# Altium PCB Driver_10kW.PcbDoc (part 2 of 2)
Units mm, origin at the board's own origin, x right, y up, seen from the top; angles counter-clockwise.
Board outline 425.08 x 200.2 mm, 2 copper layers (Top Layer, Bottom Layer); 139 components, 65 nets, 350 pads, 391 vias.
Unrouted connection lines stored in the file: 4.
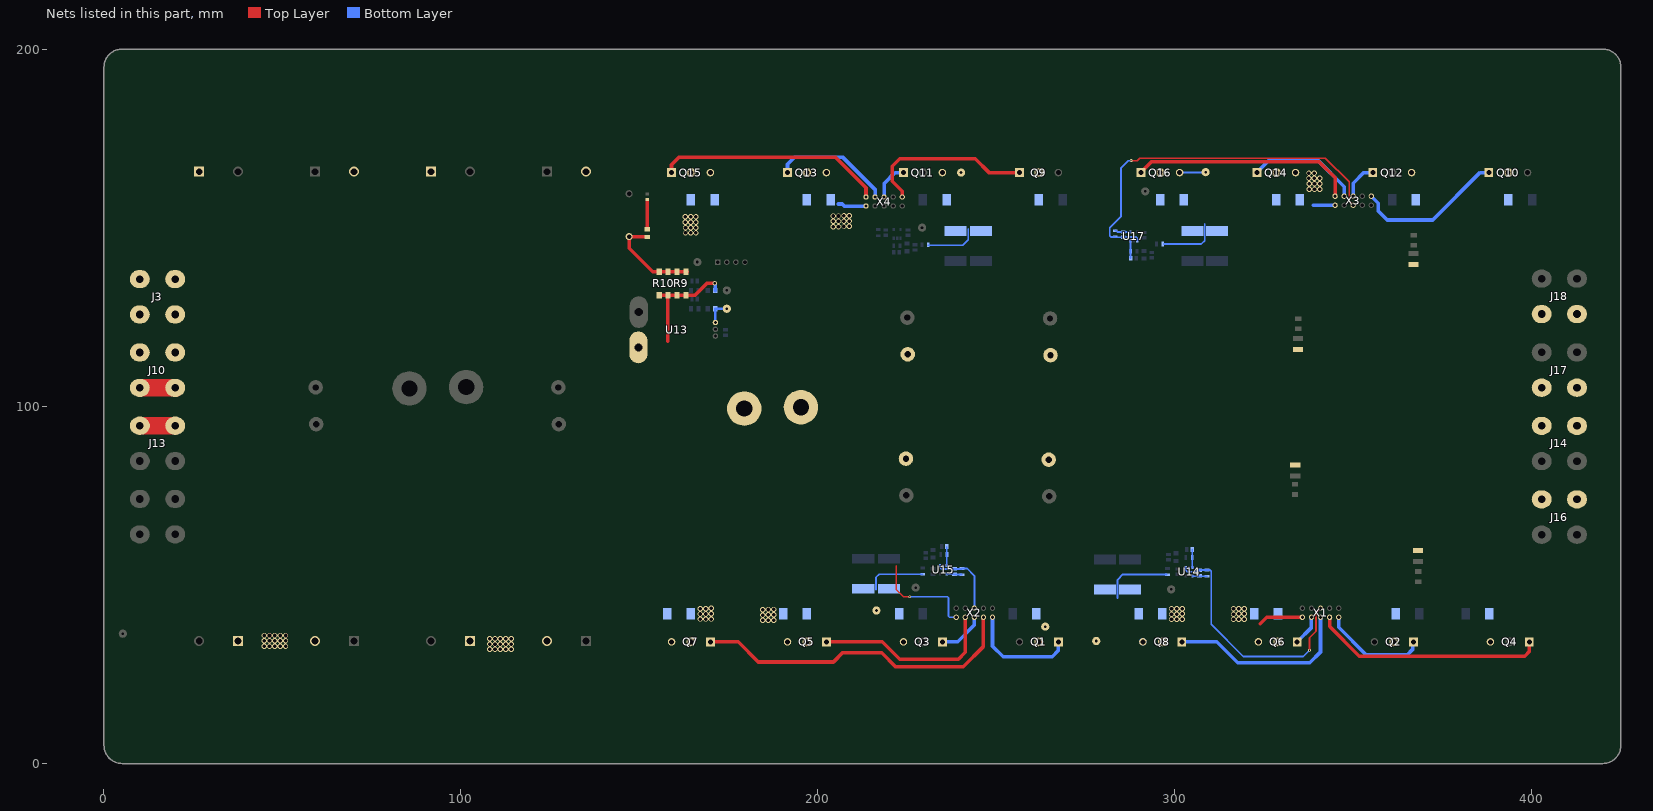
[diagram p2: the nets of this part, all layers, seen from the top]

## Via types
v1: diameter 1.5, hole 1, Top Layer to Bottom Layer, 357 vias
v2: diameter 8, hole 4.5, Top Layer to Bottom Layer, 18 vias
v3: diameter 5, hole 3, Top Layer to Bottom Layer, 8 vias
v4: diameter 0.8, hole 0.3, Top Layer to Bottom Layer, 7 vias
v5: diameter 1.27, hole 0.711, Top Layer to Bottom Layer, 1 vias

## Nets (pads, with @x,y where several pads share a name; then routed paths per layer and width w, separated by ;. In a path a pad name is that pad's centre, name@x,y a point inside that pad or via, vN(x,y) a via of type N, cw(c..) or ccw(c..) an arc to the next point about the centre after c; other vN are vias at no path point) (continued)
NetC49_1: C49.1 R71.1 U17.3 | length 4.9
  Bottom Layer w0.5: C49.1@287.661,141.626 U17.3@287.661,146.525
NetC50_1: C50.1 R72.2 U17.4 | length 4.4
  Bottom Layer w0.5: R72.2@283.414,149.351 283.69,149.351 284.066,148.975 C50.1@285.627,148.975 285.652,148.95 287.636,148.95 U17.4@287.661,148.925
NetC50_2: C50.2 R72.1 U17.1 X3.8 | length 103.6
  Top Layer w0.4: v4(287.863,168.951) 289.596,168.951 290.295,169.65 342.225,169.65 348.9,162.975 348.9,157.64 X3.8@350.08,156.46
  Bottom Layer w0.5: R72.1@283.414,147.599 282.169,147.599 281.876,147.892 281.876,150.176 285.025,153.325 285.025,166.95 287.026,168.951 v4(287.863,168.951) ; R72.1@283.54,147.475 C50.2@285.627,147.475 ; C50.2@285.627,147.551 289.193,147.551 289.486,147.258 289.486,146.6 U17.1@289.561,146.525
NetC51_1: C51.1 R73.1 U14.3 | length 5.1
  Bottom Layer w0.5: C51.1@304.945,60 R73.1@304.945,57.769 304.945,55.172 305.023,55.094 U14.3@305.023,54.969
NetC52_1: C52.1 R76.2 U14.4 | length 4.1
  Bottom Layer w0.5: U14.4@305.023,52.569 305.098,52.493 R76.2@309.094,52.493
NetC52_2: C52.2 R76.1 U14.1 X1.8 | length 68.4
  Top Layer w0.5: v4(337.825,31.77) 337.825,35.246 339.65,37.071 339.65,42.27 X1.8@340.92,43.54
  Bottom Layer w0.5: U14.1@303.123,54.969 303.123,54.219 303.573,53.769 305.958,53.769 306.434,54.245 307.044,54.245 R76.1@309.094,54.245 310.007,54.245 310.3,53.952 310.3,39 319.3,30 336.055,30 v4(337.825,31.77)
NetC53_1: C53.1 R74.1 U15.3 | length 5.2
  Bottom Layer w0.5: C53.1@236.177,60.667 236.177,55.513 U15.3@236.19,55.5
NetC54_1: C54.1 R77.2 U15.4 | length 4.3
  Bottom Layer w0.5: U15.4@236.19,53.1 236.215,53.075 238.335,53.075 C54.1@238.36,53.05 238.423,52.987 240.397,52.987 R77.2@240.46,52.924
NetC54_2: C54.2 R77.1 U15.1 X2.8 | length 20.4
  Bottom Layer w0.5: U15.1@234.29,55.5 234.365,55.425 234.365,54.843 234.658,54.55 C54.2@238.36,54.55 240.334,54.55 R77.1@240.46,54.676 241.874,54.676 243.92,52.63 X2.8@243.92,43.54
NetD1_1: D1.1 D2.3 J3.1
NetD3_1: D3.1 D4.3 J3.2
NetD5_1: D5.1 D6.3 J10.1
  other v1: 108.1,32 109.6,32 111.1,32 112.6,32 114.1,32 108.1,33.5 109.6,33.5 111.1,33.5 112.6,33.5 114.1,33.5 108.1,35 109.6,35 111.1,35 112.6,35 114.1,35
NetD7_3: D7.3 D8.1 J10.2 J13.1 | length 19.9
  Top Layer w5: J10.2@10.06,105.3 J10.2@19.966,105.3 J10.2@19.974,105.293 ; J13.1@10.075,94.675 J13.1@19.981,94.675 J13.1@19.974,94.683
  Bottom Layer w5: J13.1@19.981,94.675 J13.1@19.996,94.66
  other v1: 44.9,32.9 46.4,32.9 47.9,32.9 49.4,32.9 50.9,32.9 44.9,34.4 46.4,34.4 47.9,34.4 49.4,34.4 50.9,34.4 44.9,35.9 46.4,35.9 47.9,35.9 49.4,35.9 50.9,35.9
NetJ14_2: J14.2 Q5.3 Q7.2 R23.1 VD5.2 VD7.1 X2.5 | length 29.7
  Top Layer w0.5: 222.021,55.385 222.021,48.779 224.05,46.75 v4(225.825,46.75)
  Bottom Layer w0.5: v4(225.825,46.75) 236.376,46.75 236.669,46.457 236.669,41.293 236.962,41 X2.5@238.84,41
  other v1: 184.65,40.125 186.175,40.175 187.675,40.2 167.15,40.5 168.65,40.5 170.175,40.5 184.65,41.625 186.175,41.675 187.675,41.7 167.15,41.925 168.65,41.925 170.175,42 184.65,43.125 186.175,43.175 187.675,43.2 167.15,43.425 168.65,43.425 170.175,43.475 170.175,43.5
NetJ16_2: J16.2 Q6.3 Q8.2 R24.1 VD6.2 VD8.1 X1.5 | length 12.6
  Top Layer w1: 324.025,39.15 325.875,41 X1.5@335.84,41
  other v1: 299.15,40.45 300.65,40.45 302.175,40.45 316.525,40.45 318.05,40.45 319.55,40.45 299.15,41.875 300.65,41.875 316.525,41.875 302.175,41.95 318.05,41.95 319.55,41.95 299.15,43.375 300.65,43.375 316.525,43.375 302.175,43.425 318.05,43.425 319.55,43.425 302.175,43.45 318.05,43.45 319.55,43.45
NetJ17_1: J17.1 Q13.3 Q15.2 R64.1 VD13.2 VD15.1 X4.6 | length 7.9
  Bottom Layer w1: 205.85,156.8 206.875,156.8 207.44,156.235 X4.6@213.555,156.235
  other v1: 162.975,148.7 164.475,148.7 165.9,148.7 162.975,150.2 164.475,150.2 165.9,150.2 204.35,150.45 205.85,150.45 207.375,150.5 208.875,150.525 162.9,151.725 162.925,151.725 164.4,151.725 165.9,151.725 204.35,151.95 205.85,151.95 207.375,152 208.875,152.025 162.9,153.225 162.925,153.225 164.4,153.225 165.9,153.225 204.35,153.45 205.85,153.45 207.375,153.5 208.875,153.525
NetJ18_1: J18.1 Q14.3 Q16.2 R65.1 VD14.2 VD16.1 X3.6 | length 6.2
  Bottom Layer w0.5: 338.8,156.35 338.91,156.46
  Bottom Layer w1: 338.91,156.46 X3.6@345,156.46
  other v1: 337.725,160.95 339.225,160.95 340.725,160.95 337.725,162.45 339.225,162.45 340.725,162.45 337.675,163.975 339.175,163.975 340.675,163.975 337.675,165.475 339.175,165.475
NetQ1_1: Q1.1 X2.1 | length 30.9
  Bottom Layer w1: X2.1@249,41 249,32.925 251.975,29.95 265.7,29.95 267.44,31.69 Q1.1@267.44,34.125
NetQ2_1: Q2.1 X1.1 | length 29.5
  Bottom Layer w1: X1.1@346,41 346,38.2 353.675,30.525 365.275,30.525 366.711,31.961 366.711,33.921 Q2.1@366.915,34.125
NetQ3_1: Q3.1 X2.3 | length 13.1
  Bottom Layer w1: Q3.1@234.94,34.125 239.225,34.125 243.92,38.82 X2.3@243.92,41
NetQ3_3: Q3.3 Q7.3 R1.2 R40.2 R42.2 TP34.1 VD3.2 VD7.2 | length 16.9
  Bottom Layer w0.5: 216.35,48.766 216.35,52.175 217.256,53.081 R1.2@229.436,53.081
NetQ4_1: Q4.1 X1.2 | length 65.2
  Top Layer w1: X1.2@343.46,41 343.46,38.44 351.775,30.125 398.125,30.125 399.415,31.415 Q4.1@399.415,34.125
NetQ4_3: Q4.3 Q8.3 R2.2 R45.2 R46.2 TP35.1 VD4.2 VD8.2 | length 19.7
  Bottom Layer w0.5: 283.975,46.35 284.05,46.425 284.05,51.53 285.545,53.025 R2.2@297.775,53.025
  Bottom Layer w2: Q8.3@291.1,34.212 291.16,34.152 Q8.3@291.16,34.125
NetQ5_1: Q5.1 X2.4 | length 51.6
  Top Layer w1: Q5.1@202.44,34.125 218.125,34.125 223.025,29.225 239.45,29.225 241.38,31.155 X2.4@241.38,41
NetQ6_1: Q6.1 X1.4 | length 8.5
  Bottom Layer w1: Q6.1@334.39,34.125 338.38,38.115 X1.4@338.38,41
NetQ7_1: Q7.1 X2.2 | length 92
  Top Layer w1: Q7.1@169.94,34.125 177.725,34.125 183.375,28.475 204.425,28.475 206.975,31.025 217.95,31.025 221.825,27.15 240.775,27.15 246.46,32.835 X2.2@246.46,41
NetQ8_1: Q8.1 X1.3 | length 52.3
  Bottom Layer w1: Q8.1@302.04,34.125 311.825,34.125 317.725,28.225 337.875,28.225 340.92,31.27 X1.3@340.92,41
NetQ9_1: Q9.1 X4.5 | length 47.9
  Top Layer w1: X4.5@223.715,158.775 223.715,160.351 220.875,163.191 220.875,167.349 223.015,169.488 244.137,169.488 248,165.625 Q9.1@256.56,165.625
NetQ10_1: Q10.1 X3.5 | length 42.5
  Bottom Layer w1: X3.5@355.16,159 357.1,157.06 357.1,154.825 359.6,152.325 372.325,152.325 385.625,165.625 Q10.1@388.06,165.625
NetQ11_1: Q11.1 X4.3 | length 10.5
  Bottom Layer w1: X4.3@218.635,158.775 218.635,162.56 221.7,165.625 Q11.1@224.06,165.625
NetQ11_3: Q11.3 Q15.3 R5.2 R107.2 R109.2 TP56.1 VD11.2 VD15.2 | length 15
  Bottom Layer w0.5: R5.2@230.894,145.275 240.65,145.275 242.2,146.825 242.2,149.902
NetQ12_1: Q12.1 X3.3 | length 10.4
  Bottom Layer w1: X3.3@350.08,159 350.08,162.63 353.075,165.625 Q12.1@355.56,165.625
NetQ12_3: Q12.3 Q16.3 R6.2 R112.2 R114.2 TP57.1 VD12.2 VD16.2 | length 24
  Top Layer w0.5: Q16.3@301.44,165.625 Q16.3@301.49,165.675 ; TP57.1@308.675,165.675 TP57.1@308.725,165.725
  Bottom Layer w0.5: R6.2@297.066,145.6 307.525,145.6 308.45,146.525 308.45,151.25 ; Q16.3@301.44,165.625 301.49,165.675 308.675,165.675 TP57.1@308.725,165.725
NetQ13_1: Q13.1 X4.2 | length 33.5
  Bottom Layer w1: Q13.1@191.56,165.625 191.56,167.992 193.418,169.85 207.125,169.85 216.095,160.88 X4.2@216.095,158.775
NetQ14_1: Q14.1 X3.2 | length 31.7
  Bottom Layer w1: Q14.1@323.06,165.625 326.56,169.125 340.05,169.125 347.54,161.635 X3.2@347.54,159
NetQ15_1: Q15.1 X4.1 | length 63.6
  Top Layer w1: Q15.1@159.06,165.625 159.06,167.81 161.1,169.85 205.075,169.85 213.555,161.37 X4.1@213.555,158.775
NetQ16_1: Q16.1 X3.1 | length 62.7
  Top Layer w1: Q16.1@290.56,165.625 293.53,168.595 340.58,168.595 345,164.175 X3.1@345,159
NetR9_1: R9.1 R10.1 R121.2 VD17.1 | length 27.4
  Top Layer w1: R121.2@152.3,147.599 152.262,147.637 147.213,147.637 VD17.1@147.175,147.675 147.175,144.411 153.761,137.825 R10.1@155.6,137.825 R10.1@158.05,137.825 161,137.825 R9.1@163.45,137.825
NetR54_2: R54.2 TP3.1 U13.3 | length 7.2
  Bottom Layer w0.5: R54.2@171.276,127.488 R54.2@171.315,127.449
  Bottom Layer w0.6: U13.3@171.315,123.642 U13.3@171.354,123.603
  Bottom Layer w0.8: U13.3@171.315,123.642 171.315,127.449 TP3.1@174.55,127.449
NetR121_1: R121.1 VD18.2 | length 8.3
  Top Layer w1: VD18.2@152.25,158.05 152.3,158 R121.1@152.3,149.751
V_BAT: C5.2 C55.2 C56.2 C57.2 L3.2 Q1.2 Q2.2 Q5.2 Q6.2 Q9.2 Q10.2 Q13.2 Q14.2 TP6.1 VD1.1 VD2.1 VD5.1 VD6.1 VD9.1 VD10.1 VD13.1 VD14.1
V_PS: L3.1 R9.2 R10.2 R53.2 U13.5 | length 32
  Top Layer w1: R10.2@155.6,131.275 R10.2@158.05,131.275 ; 158.05,118.339 R10.2@158.05,131.275 ; v5(171.225,134.575) 171.173,134.627 168.998,134.627 165.646,131.275 R9.2@163.075,131.275 R9.2@160.625,131.275 R10.2@158.05,131.275
  Bottom Layer w1: v5(171.225,134.575) 171.25,134.55 171.25,132.596 R53.2@171.276,132.571
pads on no net: X1.10 X2.10 X3.10 X4.10
copper on no net: | length 51.7
  Bottom Layer w4: 9.775,114.65 35.175,114.65 ; 10.06,115.206 36.369,115.206
  other v3: 5.125,5.125 147,5.125 279,5.125 420,5.125 5.125,195.125 147,195.125 279,195.125 420,195.125

## Polygon pours and split planes (outlines as drawn)
NetC15_2 on Bottom Layer "NONET_L-01_P-001" (solid, pour order 146): 229.207,45.2 229.207,37.85 234.5,37.85 234.5,45.2
NetJ17_1 on Bottom Layer "NONET_L-01_P-001" (solid, pour order 141): 202.45,149.075 202.45,161.4 209.9,161.4 209.9,149.075
NetJ18_1 on Bottom Layer "NONET_L-01_P-001" (solid, pour order 142): 341.675,164.437 341.675,154.731 333.659,154.731 333.659,161.801 332.45,163.01 332.45,167.175 338.937,167.175
GND on Bottom Layer "NONET_L-01_P-001" (solid, pour order 119): 317,135.65 301.025,119.675 260.13,119.675 260.13,124.97 274.441,139.281 296.791,139.281 299.685,142.175 317,142.175
GND on Bottom Layer "NONET_L-01_P-001" (solid, pour order 109): 231.6,62.8 224.423,55.623 208,55.623 208,73.4 214.7,80.1 231.6,80.1
GND on Bottom Layer "NONET_L-01_P-001" (solid, pour order 118): 214.2,122.7 214.2,119.5 231.8,119.5 250.8,138.5 250.8,142.175 233.675,142.175 231.625,140.125 225.5,140.125 214.2,128.825
NetQ12_3 on Bottom Layer "NONET_L-01_P-001" (solid, pour order 137): 300.022,147.775 300.022,167.873 316.525,167.873 316.525,147.775
GND on Bottom Layer "NONET_L-01_P-001" (solid, pour order 80): 34,167.5 34,137.2 63.3,107.9 63.3,103.5 56.9,97.1 56.9,92.6 66.8,82.7 73.2,82.7 77.7,87.2 77.7,112.4 105.8,140.5 105.8,166.278 103.878,168.2 100.6,168.2 96.6,164.2 88.8,156.4 56.9,156.4 43.678,169.622 35.879,169.622
GND on Bottom Layer "NONET_L-01_P-001" (solid, pour order 87): 95.2,31 95.2,40.1 70.9,64.4 61.2,64.4 61.2,48.491 69.009,48.491 86.5,31
GND on Bottom Layer "NONET_L-01_P-001" (solid, pour order 108): 256,71.7 271.875,55.825 292.4,55.825 292.4,67.2 279.6,80 256,80
NetQ3_3 on Bottom Layer "NONET_L-01_P-001" (solid, pour order 105): 154.3,45.573 154.3,20.216 167.816,6.7 218.668,6.7 225.475,13.507 225.475,36.716 224.05,38.141 224.05,45.45 224.05,50.699 208.1,50.699 208.1,34.105 203.295,29.3 188.8,29.3 178.024,18.524 172.892,18.524 161.47,29.7 161.47,36.325 159.042,38.753 159.042,45.573
V_PS on Bottom Layer "NONET_L-01_P-001" (solid, pour order 145): 146.603,121.143 146.603,106.243 160.753,92.093 184.603,92.093 184.603,106.743 176.603,114.743 168.403,114.743 162.003,121.143
V_BAT on Bottom Layer "NONET_L-01_P-001" (solid, pour order 116): 326.258,32.65 326.249,37.324 326.213,55.687 299.7,82.2 261.975,82.2 261.975,101 349.6,101 349.6,60.804 363.575,46.829 363.575,32.65 358.85,32.65 358.85,39.025 351.046,46.829 335.403,46.829 331.249,42.515 331.249,32.65
NetQ4_3 on Bottom Layer "NONET_L-01_P-001" (solid, pour order 95): 276.7,50.2 276.7,22.2 293.746,5.154 379.754,5.154 391.3,16.7 391.3,36 385.23,36 376.9,36 366.65,25.75 356.45,25.75 349,18.3 304.695,18.3 293,29.995 293,36.652 291.15,38.502 291.15,43.917 291.15,50.2
V_BAT on Bottom Layer "NONET_L-01_P-001" (solid, pour order 144): 391.177,167.87 395.65,167.87 395.65,148.25 378.4,131 366,131 349.6,114.6 349.6,93.4 264.95,93.4 264.95,118.1 311.1,118.1 323.025,130.025 323.025,159.865 326.525,163.365 326.525,167.149 330.55,167.149 330.55,153.55 334.9,149.2 373.228,149.2 383.892,159.865 387.99,159.865 391.177,163.052 391.177,167.149
NetQ12_3 on Bottom Layer "NONET_L-01_P-001" (solid, pour order 143): 371.825,154.8 371.825,178.746 357.121,193.45 308.889,193.45 300.022,184.583 300.022,147.825 317.15,147.825 317.15,166.9 323.425,173.175 333.475,173.175 342.3,182 349.062,182 360.061,171.001 362.924,171.001 365.15,168.775 365.15,154.8
NetJ17_1 on Bottom Layer "NONET_L-01_P-001" (solid, pour order 140): 161.997,147.125 161.997,161.7 166.8,161.7 166.8,147.125
NetC33_2 on Bottom Layer "NONET_L-01_P-001" (solid, pour order 139): 228.1,154.8 228.1,167.403 230.022,167.403 231.213,166.212 231.213,154.8
NetC33_2 on Bottom Layer "NONET_L-01_P-001" (solid, pour order 138): 267.422,154.25 267.422,161.95 280.425,161.95 280.425,154.25
NetJ18_1 on Bottom Layer "NONET_L-01_P-001" (solid, pour order 136): 294.2,154.8 294.2,166.875 297.663,166.875 297.663,154.8
NetC34_2 on Bottom Layer "NONET_L-01_P-001" (solid, pour order 135): 359.6,155.25 359.6,167.87 363.4,167.87 363.4,155.25
NetQ12_3 on Bottom Layer "NONET_L-01_P-001" (solid, pour order 134): 365.15,154.8 365.15,167.87 369,167.87 369,154.8
NetC34_2 on Bottom Layer "NONET_L-01_P-001" (solid, pour order 133): 399,154.546 399,161.521 408.586,161.521 408.586,154.546
NetQ4_3 on Bottom Layer "NONET_L-01_P-001" (solid, pour order 129): 391.3,33.76 386.275,33.76 386.275,45.225 391.3,45.225
NetC16_2 on Bottom Layer "NONET_L-01_P-001" (solid, pour order 127): 382.909,38.55 367.4,38.55 367.4,45.8 382.909,45.8
NetJ16_2 on Bottom Layer "NONET_L-01_P-001" (solid, pour order 125): 323.928,45.55 323.928,38.9 315.5,38.9 315.5,45.55
NetJ16_2 on Bottom Layer "NONET_L-01_P-001" (solid, pour order 124): 295.025,45.475 295.025,45.175 295.025,38.4 303.25,38.4 303.25,45.475
NetJ14_2 on Bottom Layer "NONET_L-01_P-001" (solid, pour order 123): 191.9,45.4 191.9,38.425 183.325,38.425 183.325,45.4
NetJ14_2 on Bottom Layer "NONET_L-01_P-001" (solid, pour order 122): 163.025,45.525 163.025,45.225 163.025,38.45 171.3,38.45 171.3,45.525
NetC15_2 on Bottom Layer "NONET_L-01_P-001" (solid, pour order 121): 257.643,45.425 257.643,32.497 253.542,32.497 251.825,34.214 251.825,45.425
NetC15_2 on Bottom Layer "NONET_L-01_P-001" (solid, pour order 120): 227.894,45.2 227.894,32.497 231.95,32.497 231.95,45.2
V_BAT on Bottom Layer "NONET_L-01_P-001" (solid, pour order 115): 259.5,167.788 259.5,161.34 254.7,156.54 254.7,138.7 233.3,117.3 233.3,110.6 242.6,110.6 257.7,110.6 257.7,125.7 264.5,132.5 264.5,167.788
V_BAT on Bottom Layer "NONET_L-01_P-001" (solid, pour order 117): 194.721,32.012 194.721,38.083 194.721,47.629 190.3,52.05 190.3,105.7 214.914,105.7 214.914,85.507 203.6,74.193 203.6,46.962 199.5,42.862 199.5,32.015
V_BAT on Bottom Layer "NONET_L-01_P-001" (solid, pour order 114): 194.684,167.151 194.684,163.379 190.263,158.957 190.263,94.694 214.877,94.694 214.877,116.623 203.5,128 203.5,143.95 199,148.45 199,167.147
V_BAT on Bottom Layer "NONET_L-01_P-001" (solid, pour order 89): 190.3,118.1 190.3,82.2 269.244,82.2 269.244,118.1
V_BAT on Bottom Layer "NONET_L-01_P-001" (solid, pour order 112): 259.5,31.878 259.5,46.7 234.8,71.4 234.8,88.3 253.5,88.3 253.5,68.8 267.5,54.8 267.5,39.878 264.5,36.878 264.5,31.882
NetQ11_3 on Bottom Layer "NONET_L-01_P-001" (solid, pour order 106): 250.58,147.825 250.58,164.873 243.68,171.773 243.68,179.32 228.205,194.794 176.402,194.795 168.08,186.473 168.08,164.098 169.922,162.256 169.922,154.946 169.922,154.823 175.047,154.823 197.799,177.575 205.675,177.575 209.973,181.873 216.532,181.873 227.278,171.126 229.974,171.126 233.25,167.85 233.25,163.229 234.93,161.643 234.93,147.825
NetC3_2 on Bottom Layer "NONET_L-01_P-001" (solid, pour order 81): 54.5,170.4 54.5,165.4 57.1,162.8 61.3,162.8 74.3,175.8 74.3,177.1 78.5,181.3 84.2,181.3 94.8,170.7 105.758,170.7 110,166.537 110,135.4 94.8,120.2 94.8,87.1 94.8,71.9 130.9,35.8 130.9,31.472 142.1,31.472 142.1,48.3 118,72.4 118,97.6 122.6,102.2 128.9,102.2 130.9,104.2 130.9,183.6 120.9,193.6 71.3,193.6 54.5,176.8
NetD5_1 on Bottom Layer "NONET_L-01_P-001" (solid, pour order 85): 7.139,120.54 7.139,113.936 7.139,110.1 3.609,110.1 32,110.1 42.563,99.537 42.563,85.116 60.779,66.9 73.3,66.9 98.9,41.3 98.9,31 126.6,31 126.6,35.9 123.537,38.963 83.7,78.8 66.7,78.8 54.325,91.175 54.325,108.675 42.46,120.54
NetD7_3 on Bottom Layer "NONET_L-01_P-001" (solid, pour order 86): 7.139,89.737 7.154,89.722 7.232,89.8 24,89.8 25.3,88.5 25.3,72.85 33,65.15 33,30.8 62.1,30.8 62.1,37.2 57.7,41.6 57.7,67.1 40.3,84.5 40.3,97.8 29.6,108.5 26.8,108.5 7.139,108.5
"+350 VDC" on Top Layer "NONET_L-01_P-001" (solid, pour order 83): 7.148,79.435 7.148,69.197 7.251,69.3 34,69.3 54.3,89.6 54.3,97.1 58,100.8 69.6,100.8 71.1,99.3 88.6,99.3 91.6,102.3 91.6,109.513 97.312,115.225 138.925,115.225 145.855,122.155 153.7,122.155 153.7,132.8 144,142.5 87.997,142.5 63.37,117.804 28.3,117.804 28.3,82.8 24.935,79.435 7.371,79.435
GND on Top Layer "NONET_L-01_P-001" (solid, pour order 84): 7.148,67.875 35.175,67.875 56,88.7 56,96.261 58.039,98.3 68,98.3 70.039,96.261 118.261,96.261 121.6,99.6 148.5,99.6 156.2,91.9 199.158,91.9 204.05,96.792 204.05,130.49 221.275,130.49 221.275,71.85 184.2,71.85 167.75,55.4 77.4,55.4 64.5,42.5 39.005,42.5 31,34.505 31,30.75 24.75,30.75 7.148,48.352
NetJ18_1 on Top Layer "NONET_L-01_P-001" (solid, pour order 102): 294.2,167 294.2,157.3 310.1,141.4 346.3,141.4 359.325,128.375 388.425,128.375 395.413,121.387 416,121.387 416,129.979 400.321,129.979 385.3,145 365,145 356.565,153.435 343.14,153.435 341.875,154.7 341.875,163.975 338.85,167 331.5,167 331.5,162.8 328.2,159.5 302.3,159.5 298.6,163.2 298.6,167
NetJ14_2 on Top Layer "NONET_L-01_P-001" (solid, pour order 91): 162,32.5 162,45.236 186.714,69.95 270.45,69.95 299.5,99 337,99 416,99 416,90 349.185,90 336.685,77.5 301.6,77.5 276.675,52.575 259.925,52.575 257.5,55 234.55,55 231.55,52 201.275,52 193.5,44.225 193.5,31.902 187.773,31.902 181.2,38.475 168.775,38.475 167,36.7 167,32.5
NetC15_2 on Top Layer "NONET_L-01_P-001" (solid, pour order 92): 416,88.5 350.1,88.5 337.67,76.07 302.373,76.07 277.578,51.275 258.825,51.275 256.575,53.525 235.9,53.525 226.992,44.617 226.992,32.497 232,32.497 232,35.95 235.45,39.4 235.45,42.775 238.65,45.975 250.425,45.975 251.825,44.575 251.825,34.355 253.683,32.497 258.8,32.497 258.8,36.7 262.625,40.525 289.625,40.525 309.1,60 341.06,60 356.56,75.5 389.9,75.5 394.4,80 416,80
NetJ16_2 on Top Layer "NONET_L-01_P-001" (solid, pour order 93): 294.1,32.9 294.1,42.6 310,58.5 342.2,58.5 357.7,74 391,74 395.513,78.513 416,78.513 416,69.973 400.373,69.973 389.4,59 364.2,59 351.55,46.35 333.45,46.35 325.7,38.6 325.7,32.5 319.6,32.5 313.85,38.25 300.425,38.25 298.825,36.65 298.825,32.5 294.1,32.5
NetC16_2 on Top Layer "NONET_L-01_P-001" (solid, pour order 94): 416,56 396.325,36.325 396.325,32.648 391.675,32.648 391.675,36.375 389.55,38.5 360.919,38.5 358.2,35.781 358.2,32.65 354.402,32.648 351.475,35.575 351.475,43.975 365,57.5 391,57.5 402.006,68.506 416,68.506
NetJ17_1 on Top Layer "NONET_L-01_P-001" (solid, pour order 100): 161.997,167.149 161.997,145.55 184.75,145.55 197.8,132.5 267.5,132.5 299.5,100.5 337,100.5 416,100.5 416,110 349.185,110 336.685,122.5 301.6,122.5 276.2,147.9 234.7,147.9 215.7,147.9 209.812,153.788 209.812,161.388 203.202,167.998 200.5,167.998 200.5,163.1 197.5,160.1 170.2,160.1 167,163.3 167,167.149
NetC33_2 on Top Layer "NONET_L-01_P-001" (solid, pour order 101): 416,111.4 350.2,111.4 337.6,124 302.303,124 276.903,149.4 235.488,149.4 227.45,157.438 227.45,167.403 232.1,167.403 232.1,163.3 234.4,161 262.9,161 265,163.1 265,167.87 269.608,167.87 281.23,167.87 309.2,139.9 345.1,139.9 358.2,126.8 387.6,126.8 394.4,120 416,120
NetC34_2 on Top Layer "NONET_L-01_P-001" (solid, pour order 103): 416,153.27 401.25,168.02 396.7,168.02 396.7,163.47 394.605,161.375 365.57,161.375 363.1,163.845 363.1,167.87 359.075,167.87 359.075,153.725 366.3,146.5 386.6,146.5 401.706,131.394 416,131.394
V_PS on Top Layer "NONET_L-01_P-001" (solid, pour order 90): 146.5,121.4 146.5,106.5 158.769,94.231 184.5,94.231 184.5,107 176.5,115 168.3,115 161.9,121.4
GND on Top Layer "NONET_L-01_P-001" (solid, pour order 107): 209.3,81 209.3,71.84 268.936,71.84 276.196,79.1 276.196,81
GND on Top Layer "NONET_L-01_P-001" (solid, pour order 110): 209.3,119.5 209.3,131 266.1,131 276.196,120.904 276.196,119.675
GND on Top Layer "NONET_L-01_P-001" (solid, pour order 111): 276.196,79.1 209.3,79.1 209.3,121 276.196,121
NetD1_1 on Top Layer "NONET_L-01_P-001" (solid, pour order 76): 7.139,131.5 7.139,151.014 21.925,165.8 24.53,168.405 28.395,168.405 36.5,160.3 59.625,160.3 67.4,168.075 71.016,168.075 72.775,166.316 72.775,157.675 57.5,142.4 31.721,142.4 20.821,131.5
NetD3_1 on Top Layer "NONET_L-01_P-001" (solid, pour order 77): 7.139,120.2 62.5,120.2 87.7,145.4 134.1,145.4 139.575,150.875 139.575,165.877 136.902,168.55 131.55,168.55 122.975,159.975 99.025,159.975 95.35,163.65 95.35,168.25 93.65,169.95 88.65,169.95 59.175,140.475 32.453,140.475 21.7,129.722 7.139,129.722
NetC3_2 on Top Layer "NONET_L-01_P-001" (solid, pour order 88): 66.158,31.472 66.158,40.458 77.9,52.2 131.3,52.2 142.1,41.4 142.1,31.472 130.9,31.472 130.9,35.8 127.342,39.358 85.286,39.358 77.4,31.472
NetD7_3 on Top Layer "NONET_L-01_P-001" (solid, pour order 65): 34,34.5 39.625,40.125 57.225,40.125 61.85,35.5 61.85,30.9 34,30.9
NetD5_1 on Top Layer "NONET_L-01_P-001" (solid, pour order 66): 99.766,36.6 126.125,36.6 126.125,30.6 99.766,30.6

## Other copper
Top Layer:
  rectangle net NetD5_1: 100.125,32.025 125.925,36.425
  rectangle net NetD7_3: 7.175,90.6 23.2,108.7
  rectangle net GND_1: 7.154,81.575 23.307,88.48
  rectangle net NetD3_1: 7.139,122.6 22.744,128.899
  rectangle net NetD7_3: 35.725,30.9 61.125,36.225
  pour cut-out: 363.499,140.527 370.37,140.527 370.37,147.2 363.499,147.2
  pour cut-out: 371.871,58.998 365,58.998 365,51.623 371.871,51.623
  pour cut-out: 337.475,116.707 337.475,123.973 331.752,123.973 331.752,116.707
  pour cut-out: 330.238,82.937 330.238,76.066 337.613,76.066 337.613,82.937
  pour cut-out: 261.9,117.95 261.9,111.05 268.8,111.05 268.8,117.95
  pour cut-out: 261.35,88.7 261.35,81.8 268.25,81.8 268.25,88.7
  pour cut-out: 221.3,88.75 221.3,81.85 228.2,81.85 228.2,88.75
  pour cut-out: 221.8,118.2 221.8,111.3 228.7,111.3 228.7,118.2
Bottom Layer:
  pour cut-out: 313.2,172.75 313.2,178.15 310.2,181.15 305.025,181.15 302.1,178.225 302.1,172.825 304.775,170.15 310.6,170.15
  pour cut-out: 170.1,178.312 170.1,172.912 173.1,169.912 178.275,169.912 181.2,172.837 181.2,178.237 178.525,180.912 172.7,180.912
  pour cut-out: 207.288,27.2 207.288,21.8 210.287,18.8 215.463,18.8 218.388,21.725 218.387,27.125 215.712,29.8 209.887,29.8
  pour cut-out: 377.1,27.375 377.1,21.975 380.1,18.975 385.275,18.975 388.2,21.9 388.2,27.3 385.525,29.975 379.7,29.975
  pour cut-out: 115.687,181.362 112.6,178.275 112.6,172.7 115.728,169.572 121.422,169.572 124.7,172.85 124.7,178.35 121.688,181.362

## Silkscreen, mask and mechanical layers (free items; w line width, h text height)
Top Overlay:
  circle w0.2: c295,150 r2
  circle w0.2: c385,150 r2
  circle w0.2: c385,50 r2
  circle w0.2: c295,50 r2
  circle w0.254: c420,195.125 r2.5
  circle w0.254: c420,5.125 r2.5
  circle w0.254: c5.125,195.125 r2.5
  circle w0.254: c5.125,5.125 r2.5
  lines w0.2: -9.203,100 422.459,100 ; 20.124,1.97 20.124,198.925 ; 20.124,29.169 32.124,29.169 ; 20.124,169.622 32.124,169.622 ; 22.685,198.275 26.659,198.275 ; 32.124,27.426 32.124,29.169 ; 32.124,176.049 32.124,169.622 ; 64.624,26.824 64.624,29.169 ; 64.624,174.949 64.624,169.622 ; 97.124,26.426 97.124,29.169 ; 97.124,173.376 97.124,169.622 ; 129.624,26.324 129.624,29.169 97.124,29.169 ; 129.624,173.624 129.624,169.622 97.124,169.622 ; 152.125,171.126 164.125,171.126 ; 164.125,177.553 164.125,171.126 ; 164.525,25.547 164.525,29.549 197.025,29.549 ; 196.625,176.453 196.625,171.126 ; 197.025,25.794 197.025,29.549 ; 229.125,174.881 229.125,171.126 ; 229.525,24.222 229.525,29.549 ; 261.625,175.128 261.625,171.126 229.125,171.126 ; 262.025,23.122 262.025,29.549 ; 274.025,29.549 262.025,29.549 ; 284.175,171.001 296.175,171.001 ; 296.175,177.428 296.175,171.001 ; 296.475,25.122 296.475,29.124 328.975,29.124 ; 328.675,176.328 328.675,171.001 ; 328.975,25.369 328.975,29.124 ; 361.175,174.756 361.175,171.001 ; 361.475,23.797 361.475,29.124 ; 393.675,175.003 393.675,171.001 361.175,171.001 ; 393.975,22.697 393.975,29.124 ; 405.975,29.124 393.975,29.124 ; 32.124,29.169 64.624,29.169 ; 32.124,169.622 64.624,169.622 ; 64.624,29.169 97.124,29.169 ; 64.624,169.622 97.124,169.622 ; 164.125,171.126 196.625,171.126 ; 196.625,171.126 229.125,171.126 ; 197.025,29.549 229.525,29.549 ; 229.525,29.549 262.025,29.549 ; 296.175,171.001 328.675,171.001 ; 328.675,171.001 361.175,171.001 ; 328.975,29.124 361.475,29.124 ; 361.475,29.124 393.975,29.124 ; 290,50 ccw(c295,50) 295,45 385,45 ccw(c385,50) 390,50 390,150 ccw(c385,150) 385,155 295,155 ccw(c295,150) 290,150 290,50
Top Solder:
  lines w4: 10.069,74.15 28.45,74.15 37.6,83.3 37.6,92.525 50.484,105.409 84.866,105.409 85.7,106.243 85.918,106.243 105.7,126.025 149.275,126.025 149.625,125.675 ; 149.425,116.325 155.075,116.325 171.654,99.746 179.779,99.746 ; 176.9,154.125 193.175,154.125 207.539,139.761 272.464,139.761 306.9,105.325 412.79,105.325 ; 178.45,47.875 191.65,61.075 191.975,61.075 ; 192.3,61.075 273.55,61.075 307.125,94.65 402.884,94.65 ; 234.269,46.75 234.3,46.75 236.775,49.225 253.025,49.225 256.725,45.525 279.4,45.525 300,66.125 338.025,66.125 356.825,84.925 412.475,84.925 ; 241.4,152.575 282.15,152.575 303.15,131.575 341.4,131.575 357.744,115.231 412.79,115.231 ; 308.657,43.982 316.25,51.575 317.775,51.575 318.15,51.575 318.625,51.575 347.1,51.575 361.575,66.05 389.875,66.05 398.05,74.225 402.325,74.225 402.5,74.05 412.79,74.05 ; 364.7,157.025 392.675,157.025 402.65,147.05 402.65,136.325 403.175,135.8 ; 384.55,42.35 389.65,42.35 402.925,55.625 402.925,64.35 ; 404.05,94.55 413.2,94.55
Bottom Solder:
  lines w2: 59.165,165.897 59.165,172.515 73.725,187.075 93.626,187.075 117.975,162.726 117.975,121.725 101.758,105.508 ; 73.1,52.725 91.472,34.353 91.665,34.353 ; 124.165,165.51 124.165,110.49 111.7,98.025 111.7,60.925 135.085,37.54 135.085,34.353 ; 159.042,34.107 159.042,22.733 169.775,12 216.625,12 224.06,19.435 224.06,34.125 ; 169.94,165.625 180.175,165.625 201.625,187.075 221.925,187.075 242.325,166.675 242.325,152.075 ; 197,33.925 197,73.875 ; 197,165.625 197,128.05 200.725,124.325 ; 244.3,70.175 262,52.475 262,34.125 ; 273.75,127.4 299.35,127.4 308.3,136.35 ; 284.124,25.55 284.15,25.576 284.15,44.775 ; 284.15,25.55 297.625,12.075 357.55,12.075 379.6,34.125 388.535,34.125 ; 308.35,152.1 308.35,161.625 333.325,186.6 354.875,186.6 366.525,174.95 366.525,165.71 ; 324.275,121.65 328.5,125.875 328.5,165.625 ; 327.05,63.4 328.95,61.5 328.95,34.125 ; 342.2,61.425 361.475,42.15 361.475,34.125 ; 364.55,140.35 384.15,140.35 393.5,149.7 393.5,165.625
  lines w4: 10.06,115.206 35.419,115.206 48.2,102.425 48.2,88.875 64.7,72.375 78.9,72.375 79.725,72.375 110.575,41.525 110.575,39.4 ; 69.625,93.825 69.625,128.1 ; 149.519,116.325 155.075,116.325 171.908,99.492 179.45,99.492
Mechanical 1:
  circle w0.254: c385,150 r1.5
  circle w0.254: c385,50 r1.5
  circle w0.254: c295,50 r1.5
  circle w0.254: c295,150 r1.5
  circle w0.254: c420,195.125 r1.5
  circle w0.254: c420,5.125 r1.5
  circle w0.254: c5.125,5.125 r1.5
  circle w0.254: c5.125,195.125 r1.5
  lines w0.2: 0.125,5.125 ccw(c5.125,5.125) 5.125,0.125 420,0.125 ccw(c420,5.125) 425,5.125 425,195.125 ccw(c420,195.125) 420.027,200.125 ; 0.125,5.154 0.125,195.125 cw(c5.125,195.125) 5.125,200.125 ; 5.1,200.125 420.002,200.125

## Text inside footprints (layer, text, board x,y; h text height)
C3: Top Overlay "-" at 129.25,86.867 h3.81 r90; Top Overlay "+" at 129.124,110.616 h3.81 r90
C4: Top Overlay "-" at 61.25,86.867 h3.81 r90; Top Overlay "+" at 61.124,110.616 h3.81 r90
C5: Top Overlay "+" at 226.524,90.641 h3.81 r90; Top Overlay "-" at 226.65,66.892 h3.81 r90
C55: Top Overlay "-" at 223.35,133.242 h3.81 r270; Top Overlay "+" at 223.476,109.493 h3.81 r270
C56: Top Overlay "+" at 266.524,90.391 h3.81 r90; Top Overlay "-" at 266.65,66.642 h3.81 r90
C57: Top Overlay "+" at 263.476,109.234 h3.81 r270; Top Overlay "-" at 263.35,132.983 h3.81 r270